# Altium PCB ide_podule-16bit.PcbDoc (part 2 of 2)
Units mm, origin at the board's own origin, x right, y up, seen from the top; angles counter-clockwise.
Board outline 101.85 x 63.25 mm, 2 copper layers (F.Cu, B.Cu); 33 components, 144 nets, 438 pads, 182 vias.
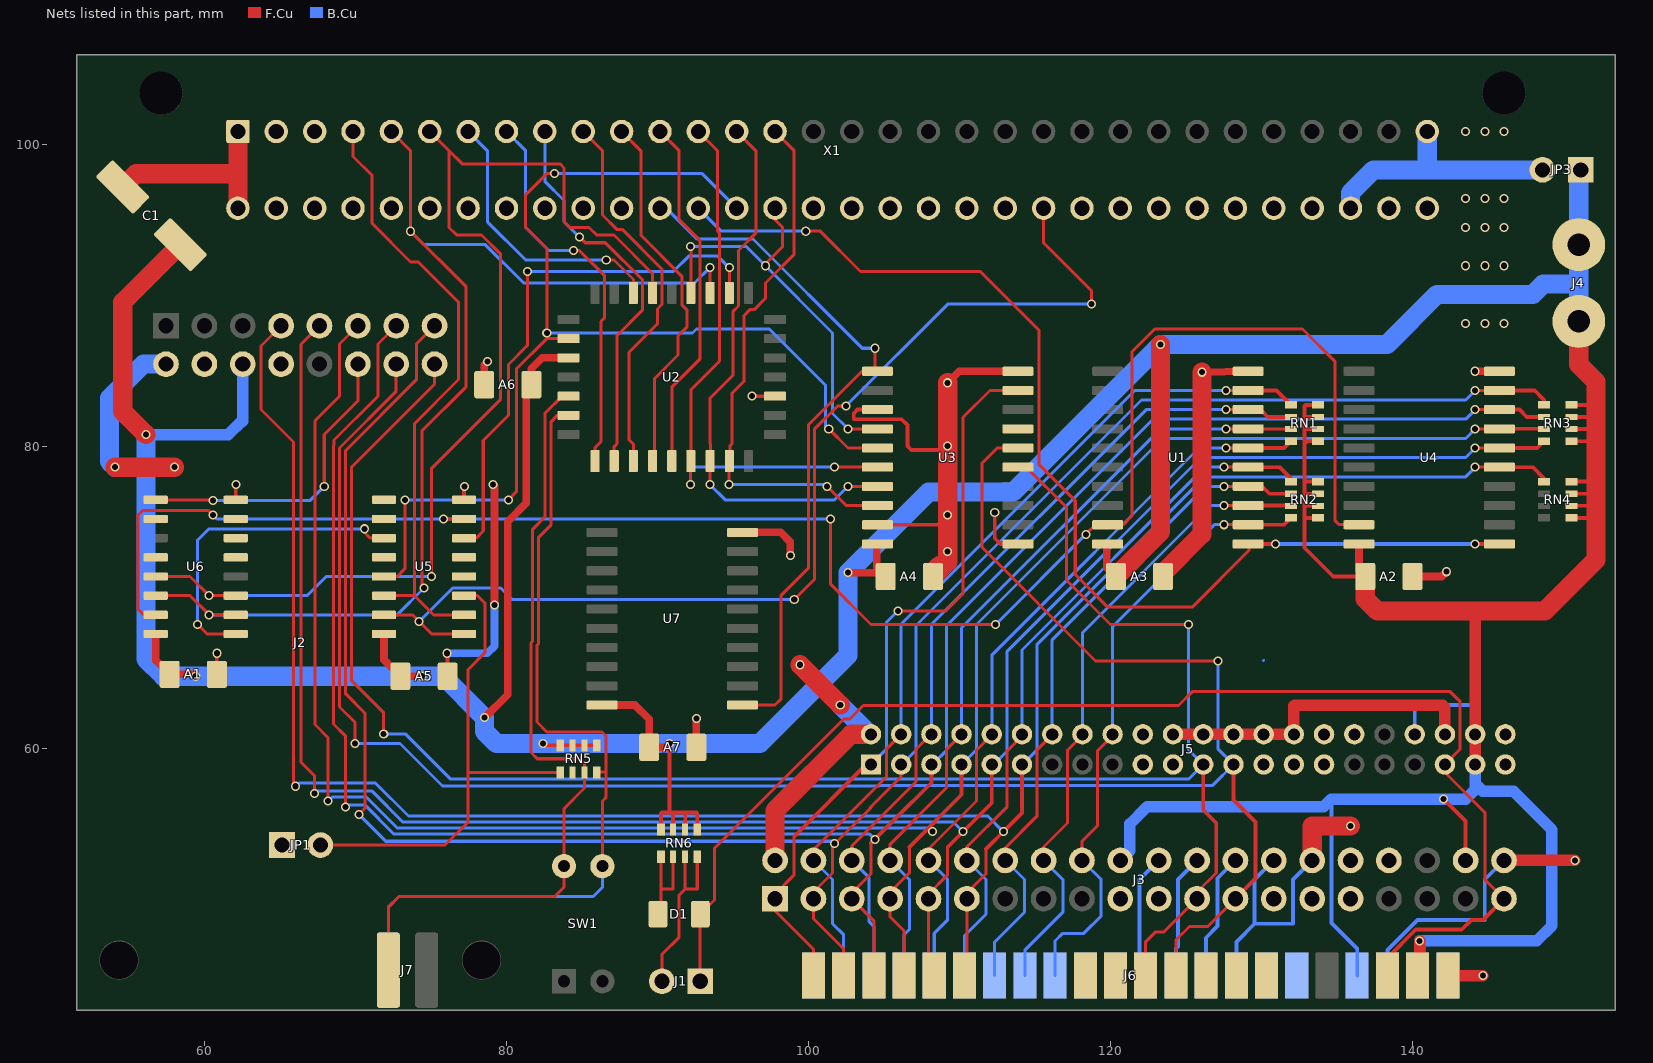
[diagram p2: the nets of this part, all layers, seen from the top]

## Via types
v1: diameter 0.6, hole 0.4, F.Cu to B.Cu, tented both sides, 182 vias

## Nets (pads, with @x,y where several pads share a name; then routed paths per layer and width w, separated by ;. In a path a pad name is that pad's centre, name@x,y a point inside that pad or via, vN(x,y) a via of type N, cw(c..) or ccw(c..) an arc to the next point about the centre after c; other vN are vias at no path point) (continued)
D3: J2.7 J3.11 J5.11 J6.11 RN4.1 U4.5 | length 143.7
  F.Cu w0.2: J2.7@65.089,87.986 63.754,86.651 63.754,82.447 65.913,80.288 65.913,57.632 v1(66.043,57.502) ; J6.11@110.33,44.97 110.49,45.13 J3.11@110.49,50.05 110.49,50.431 111.76,51.701 111.76,53.352 ; v1(144.145,78.625) U4.5@145.797,78.625
  F.Cu w0.254: 111.76,53.352 113.093,54.685 v1(112.903,54.495) 114.14,55.732 J5.11@114.14,58.94 ; U4.5@145.797,78.625 147.955,78.625 148.706,77.874 RN4.1@148.706,77.666
  B.Cu w0.2: v1(66.043,57.502) 66.263,57.721 71.323,57.721 73.52,55.524 111.874,55.524 v1(112.903,54.495) ; J5.11@114.14,58.94 114.173,58.94 115.126,59.892 115.126,66.877 126.238,77.99 143.51,77.99 v1(144.145,78.625)
D4: J2.9 J3.9 J5.9 J6.9 RN3.4 U4.6 | length 141.1
  F.Cu w0.2: v1(67.31,57.02) 67.31,58.178 66.402,59.086 66.402,86.759 J2.9@67.629,87.986 ; J6.9@108.33,44.97 107.95,45.35 J3.9@107.95,50.05 107.95,50.367 109.22,51.637 109.22,53.479 ; v1(144.145,79.895) U4.6@145.797,79.895
  F.Cu w0.254: 109.22,53.479 112.14,56.399 J5.9@112.14,58.94 ; U4.6@145.797,79.895 148.255,79.895 RN3.4@148.706,80.346
  B.Cu w0.2: v1(67.31,57.02) 67.484,57.194 71.088,57.194 73.158,55.124 109.607,55.124 v1(110.236,54.495) ; J5.9@112.14,58.94 112.268,58.94 113.157,59.829 113.157,66.433 125.984,79.26 143.51,79.26 v1(144.145,79.895)
D5: J2.11 J3.7 J5.7 J6.7 RN3.3 U4.7 | length 143
  F.Cu w0.2: v1(68.199,56.512) 68.199,60.718 67.329,61.588 67.329,81.692 68.961,83.324 68.961,86.778 J2.11@70.169,87.986 ; J6.7@106.33,44.97 106.33,47.928 105.41,48.848 J3.7@105.41,50.05 105.41,50.494 106.68,51.764 106.68,53.479 ; v1(144.145,81.165) U4.7@145.797,81.165
  F.Cu w0.254: 106.68,53.479 110.14,56.939 J5.7@110.14,58.94 ; U4.7@145.797,81.165 148.687,81.165 RN3.3@148.706,81.146
  B.Cu w0.2: v1(68.199,56.512) 68.481,56.794 70.726,56.794 72.796,54.724 107.995,54.724 v1(108.204,54.515) ; J5.7@110.14,58.94 111.125,59.925 111.125,68.211 123.444,80.53 143.51,80.53 v1(144.145,81.165)
D6: J2.13 J3.5 J5.5 J6.5 RN3.2 U4.8 | length 142
  F.Cu w0.2: v1(69.342,56.131) 69.342,60.845 68.561,61.626 68.561,80.061 68.595,80.095 68.595,80.418 71.501,83.324 71.501,86.778 J2.13@72.709,87.986 ; 104.14,53.733 104.14,51.701 102.87,50.431 J3.5@102.87,50.05 104.33,48.59 J6.5@104.33,44.97 ; v1(144.145,82.435) U4.8@145.797,82.435
  F.Cu w0.254: 104.14,53.733 105.664,55.257 108.14,57.733 J5.5@108.14,58.94 ; U4.8@145.797,82.435 147.066,82.435 147.555,81.946 RN3.2@148.706,81.946
  B.Cu w0.2: v1(69.342,56.131) 69.478,56.267 70.618,56.267 72.561,54.324 104.057,54.324 v1(104.394,53.987) ; J5.5@108.14,58.94 108.204,58.94 109.156,59.892 109.156,68.147 122.809,81.8 143.51,81.8 v1(144.145,82.435)
D7: J2.15 J3.3 J5.3 J6.3 RN3.1 U4.9 | length 143.3
  F.Cu w0.2: v1(70.231,55.638) 70.627,56.034 70.627,62.354 69.361,63.62 69.361,79.729 74.041,84.409 74.041,86.778 J2.15@75.249,87.986 ; J6.3@102.33,44.97 102.33,46.729 100.33,48.729 J3.3@100.33,50.05 100.33,50.494 101.6,51.764 101.6,53.542 104.14,56.082 104.076,56.082 106.14,58.146 J5.3@106.14,58.94 ; v1(144.145,83.705) U4.9@145.797,83.705
  F.Cu w0.254: U4.9@145.797,83.705 148.082,83.705 148.706,83.081 RN3.1@148.706,82.746
  B.Cu w0.2: v1(70.231,55.638) 72.009,53.86 101.591,53.86 v1(101.727,53.724) ; J5.3@106.14,58.94 106.172,58.94 107.124,59.892 107.124,68.147 122.047,83.07 143.51,83.07 v1(144.145,83.705)
D8: J3.4 J5.4 J6.4 RN1.1 U1.9 | length 59.1
  F.Cu w0.2: J3.4@100.33,52.59 100.33,53.288 105.156,58.114 105.156,59.956 J5.4@106.14,60.94 ; v1(127.635,83.705) U1.9@129.16,83.705
  F.Cu w0.254: U1.9@129.16,83.705 130.983,83.705 RN1.1@131.942,82.746
  B.Cu w0.2: J3.4@100.33,52.59 101.6,51.32 101.6,48.399 102.33,47.669 J6.4@102.33,44.97 ; J5.4@106.14,60.94 106.14,68.243 121.602,83.705 v1(127.635,83.705)
D9: J3.6 J5.6 J6.6 RN1.2 U1.8 | length 55.9
  F.Cu w0.2: J3.6@102.87,52.59 102.87,53.542 107.124,57.797 107.124,59.956 108.109,60.94 J5.6@108.14,60.94 ; v1(127.635,82.435) U1.8@129.16,82.435
  F.Cu w0.254: U1.8@129.16,82.435 129.921,82.435 130.41,81.946 RN1.2@131.942,81.946
  B.Cu w0.2: J3.6@102.87,52.59 104.02,51.44 104.02,48.533 104.33,48.223 J6.6@104.33,44.97 ; J5.6@108.14,60.94 108.14,68.21 122.364,82.435 v1(127.635,82.435)
D10: J3.8 J5.8 J6.8 RN1.3 U1.7 | length 52.9
  F.Cu w0.2: J3.8@105.41,52.59 105.41,53.669 109.156,57.416 109.156,59.956 J5.8@110.14,60.94 ; v1(127.635,81.165) 129.16,81.165 131.923,81.165 RN1.3@131.942,81.146
  B.Cu w0.2: J3.8@105.41,52.59 106.68,51.32 106.68,48.018 106.33,47.668 J6.8@106.33,44.97 ; J5.8@110.14,60.94 110.14,67.988 123.317,81.165 v1(127.635,81.165)
D11: J3.10 J5.10 J6.10 RN1.4 U1.6 | length 49.5
  F.Cu w0.2: J3.10@107.95,52.59 107.95,53.352 111.125,56.527 111.125,59.892 112.14,60.907 J5.10@112.14,60.94 ; v1(127.635,79.895) U1.6@129.16,79.895
  F.Cu w0.254: U1.6@129.16,79.895 131.491,79.895 RN1.4@131.942,80.346
  B.Cu w0.2: J3.10@107.95,52.59 109.22,51.32 109.22,48.653 108.33,47.763 J6.10@108.33,44.97 ; J5.10@112.14,60.94 112.14,66.178 125.857,79.895 v1(127.635,79.895)
D12: J3.12 J5.12 J6.12 RN2.1 U1.5 | length 47.5
  F.Cu w0.2: J3.12@110.49,52.59 110.49,53.479 113.157,56.146 113.157,59.829 114.14,60.812 J5.12@114.14,60.94 ; v1(127.508,78.625) U1.5@129.16,78.625
  F.Cu w0.254: U1.5@129.16,78.625 131.191,78.625 131.942,77.874 RN2.1@131.942,77.666
  B.Cu w0.2: J6.12@110.33,44.97 110.33,47.604 111.76,49.034 111.76,51.32 J3.12@110.49,52.59 ; J5.12@114.14,60.94 114.14,66.527 126.238,78.625 v1(127.508,78.625)
D13: J3.14 J5.14 J6.14 RN2.2 U1.4 | length 45.1
  F.Cu w0.2: J3.14@113.03,52.59 113.03,53.415 115.126,55.511 115.126,59.892 116.14,60.907 J5.14@116.14,60.94 ; v1(127.508,77.355) U1.4@129.16,77.355
  F.Cu w0.254: U1.4@129.16,77.355 130.048,77.355 130.537,76.866 RN2.2@131.942,76.866
  B.Cu w0.2: J6.14@112.33,44.97 112.33,47.191 114.3,49.161 114.3,51.32 J3.14@113.03,52.59 ; J5.14@116.14,60.94 116.14,67.193 126.301,77.355 v1(127.508,77.355)
D14: J3.16 J5.16 J6.16 RN2.3 U1.3 | length 42.6
  F.Cu w0.2: J3.16@115.57,52.59 115.57,53.479 117.157,55.066 117.157,59.892 118.14,60.875 J5.16@118.14,60.94 ; v1(127.508,76.085) U1.3@129.16,76.085
  F.Cu w0.254: U1.3@129.16,76.085 131.923,76.085 RN2.3@131.942,76.066
  B.Cu w0.2: J6.16@114.33,44.97 114.33,46.651 116.84,49.161 116.84,51.32 J3.16@115.57,52.59 ; J5.16@118.14,60.94 118.14,67.669 126.555,76.085 v1(127.508,76.085)
D15: J3.18 J5.18 J6.18 RN2.4 U1.2 | length 41.3
  F.Cu w0.2: J3.18@118.11,52.59 118.11,53.86 119.126,54.876 119.126,59.829 120.14,60.843 J5.18@120.14,60.94 ; v1(127.508,74.815) U1.2@129.16,74.815
  F.Cu w0.254: U1.2@129.16,74.815 131.491,74.815 RN2.4@131.942,75.266
  B.Cu w0.2: J6.18@116.33,44.97 116.33,47.254 116.84,47.764 118.237,47.764 119.38,48.907 119.38,51.32 J3.18@118.11,52.59 ; J5.18@120.14,60.94 120.14,68.082 126.873,74.815 v1(127.508,74.815)
F_CE: U2.22 U5.6 | length 35.6
  F.Cu w0.2: U5.6@77.199,73.926 77.999,73.926 78.471,74.398 78.471,80.388 80.137,82.054 80.137,85.419 81.407,86.689 v1(81.407,91.579) ; U2.22@94.763,90.156 v1(94.763,91.833)
  B.Cu w0.2: v1(81.407,91.579) 91.059,91.579 92.075,92.595 94.001,92.595 v1(94.763,91.833)
F_Enable: JP1.2 RN5.5 U5.3 | length 33.1
  F.Cu w0.2: JP1.2@67.686,53.606 75.946,53.606 77.47,55.13 77.47,58.432 ; U5.3@77.199,70.116 78.09,70.116 78.576,69.63 78.576,66.333 77.47,65.226 77.47,58.432 ; RN5.5@83.579,58.41 77.492,58.41 77.47,58.432
GND: A1.2 A2.2 A3.2 A4.2 A5.2 A6.2 A7.2 C1.2 J2.2 J2.4 J3.2 J3.22 J3.24 J3.26 J3.28 J3.30 J3.40 J5.2 J5.22 J5.24 J5.26 J5.28 J5.30 J5.40 J5.43 J6.2 J6.22 J6.24 J6.26 J6.28 J6.30 J6.40 J6.43 JP1.1 U1.10 U2.16 U3.1 U3.10 U3.13 U3.19 U4.10 U5.8 U6.8 U7.10 X1.a1 X1.c1 | length 219.6
  F.Cu w0.2: J5.28@130.14,60.94 J5.28@130.207,60.94 ; J3.28@130.81,52.59 J3.28@131.127,52.907
  F.Cu w0.254: A1.2@60.833,64.909 v1(60.833,66.306) ; U6.8@62.086,76.466 62.086,77.465 v1(62.103,77.482) ; v1(76.073,66.306) 76.111,66.268 A5.2@76.111,64.782 ; U5.8@77.199,76.466 77.199,77.338 v1(77.216,77.355) ; v1(96.266,83.324) U2.16@97.79,83.324 ; U3.19@104.57,74.815 108.581,74.815 v1(109.22,75.454) ; U3.13@104.57,82.435 103.251,82.435 102.997,82.181 102.997,81.8 106.172,81.8 106.553,81.419 106.553,80.022 106.807,79.768 108.966,79.768 v1(109.22,80.022) ; v1(112.336,75.625) 112.336,73.921 112.712,73.545 U3.1@113.92,73.545
  F.Cu w0.508: A6.2@78.536,84.086 78.536,85.406 v1(78.74,85.61) ; v1(79.121,77.482) 79.214,77.389 v1(79.214,69.499) ; A7.2@92.583,60.083 v1(92.583,61.988) ; U7.10@95.631,74.307 98.171,74.307 98.806,73.672 v1(98.806,72.783) ; v1(109.22,84.213) 109.982,84.975 U3.10@113.92,84.975 ; v1(126.047,84.911) U1.10@129.16,84.975 ; A2.2@139.992,71.386 141.922,71.386 v1(142.24,71.703) ; v1(144.145,84.975) U4.10@145.797,84.975
  F.Cu w0.762: J5.22@124.14,60.94 J5.24@126.14,60.94 J5.26@128.14,60.94 J5.28@130.14,60.94 J5.30@132.14,60.94 132.14,62.817 132.2,62.877 141.986,62.877 142.14,62.723 J5.40@142.14,60.94 ; J6.43@142.33,44.97 v1(144.653,44.97) ; J3.40@146.05,52.59 v1(150.749,52.59)
  F.Cu w1.27: v1(54.102,78.625) v1(58.039,78.625) ; C1.2@54.602,97.175 55.482,98.056 62.23,98.056 ; X1.c1@62.23,95.77 62.23,98.056 ; X1.a1@62.23,100.85 62.23,98.056 ; J3.2@97.79,52.59 97.79,55.892 102.838,60.94 J5.2@104.14,60.94 ; v1(99.441,65.544) v1(102.108,62.877) ; A4.2@108.68,72.116 108.242,71.678 A4.2@108.242,71.386 109.22,72.364 v1(109.22,73.037) v1(109.22,75.454) v1(109.22,80.022) v1(109.22,84.213) ; A3.2@123.482,71.386 123.482,71.615 126.047,74.18 v1(126.047,84.911) ; J3.30@133.35,52.59 133.35,54.876 v1(135.89,54.876)
  B.Cu w0.2: 130.124,65.834 130.14,65.818
  B.Cu w0.254: J6.24@122.33,44.97 122.33,45.134 121.92,45.544 121.92,51.32 J3.22@123.19,52.59 ; J6.26@124.33,44.97 124.33,46.748 124.46,46.878 124.46,51.32 J3.24@125.73,52.59 ; J6.28@126.33,46.113 126.33,47.475 127.093,48.238 127.093,51.413 J3.26@128.27,52.59 ; J6.30@128.33,44.97 128.33,47.189 129.54,48.399 ; J3.28@130.81,52.59 129.54,51.32 129.54,48.399 ; J3.30@133.35,52.59 132.08,51.32 132.08,48.399 129.54,48.399 ; J6.40@138.33,44.97 138.33,46.648 140.335,48.653 144.78,48.653 144.78,51.32 J3.40@146.05,52.59
  B.Cu w0.508: v1(76.073,66.306) 78.74,66.306 79.214,66.78 v1(79.214,69.499)
  B.Cu w1.27: v1(54.102,78.625) 53.721,79.006 53.721,83.197 55.97,85.446 J2.2@57.469,85.446 ; v1(102.108,62.877) 104.045,60.94 J5.2@104.14,60.94
  other v1: 143.51,88.15 144.78,88.15 146.05,88.15 143.51,91.96 144.78,91.96 146.05,91.96 143.51,94.5 144.78,94.5 146.05,94.5 143.51,96.405 144.78,96.405 146.05,96.405 143.51,100.85 144.78,100.85 146.05,100.85
LA2: U2.12 U3.18 X1.a15 | length 36.3
  F.Cu w0.2: v1(94.742,77.482) 94.742,79.011 U2.12@94.763,79.031 94.793,79.062 94.793,80.022 94.945,80.174 94.945,83.527 95.743,84.325 95.743,88.673 96.124,89.054 96.408,89.054 97.155,89.801 97.155,90.817 99.06,92.722 99.06,99.58 X1.a15@97.79,100.85 ; v1(101.234,77.355) 102.504,76.085 U3.18@104.57,76.085
  B.Cu w0.2: v1(94.742,77.482) 101.107,77.482 v1(101.234,77.355)
LA3: U2.11 U3.17 X1.a14 | length 37.1
  F.Cu w0.2: v1(93.472,77.482) 93.472,79.011 U2.11@93.493,79.031 93.523,79.062 93.523,80.174 93.472,80.225 93.472,83.167 94.996,84.691 94.996,88.912 95.377,89.293 95.377,92.976 96.52,94.119 96.52,99.58 X1.a14@95.25,100.85 ; v1(102.616,77.355) U3.17@104.57,77.355
  B.Cu w0.2: v1(93.472,77.482) 94.488,76.466 101.727,76.466 v1(102.616,77.355)
LA4: U2.10 U3.16 X1.a13 | length 38.1
  F.Cu w0.2: v1(92.202,77.482) 92.202,79.011 U2.10@92.223,79.031 92.223,83.756 94.107,85.64 94.107,94.119 93.98,94.246 93.98,99.58 X1.a13@92.71,100.85 ; v1(101.727,78.625) U3.16@104.57,78.625
  B.Cu w0.2: v1(92.202,77.482) 92.202,78.371 92.456,78.625 v1(101.727,78.625)
LA5: U2.9 X1.a12 | length 23.7
  F.Cu w0.2: X1.a12@90.17,100.85 91.44,99.58 91.44,95.008 92.837,93.611 92.837,85.806 90.953,83.922 U2.9@90.953,79.031
LA6: U2.8 X1.a11 | length 24.5
  F.Cu w0.2: X1.a11@87.63,100.85 88.9,99.58 88.9,93.992 91.622,91.269 91.622,89.378 91.948,89.053 91.948,87.896 91.37,87.318 91.37,86.048 89.823,84.501 89.823,79.172 U2.8@89.683,79.031
LA7: U2.7 X1.a10 | length 25.2
  F.Cu w0.2: X1.a10@85.09,100.85 86.36,99.58 86.36,95.32 87.307,94.373 87.669,94.373 90.297,91.745 90.297,89.393 90.005,89.101 90.005,88.112 88.123,86.23 88.123,80.438 88.413,80.149 U2.7@88.413,79.031
LA8: U2.6 X1.a9 | length 26.1
  F.Cu w0.2: v1(84.836,93.865) 85.217,93.484 86.556,93.484 89.027,91.013 89.027,89.039 87.323,87.335 87.323,81.665 87.319,81.66 87.319,80.161 87.143,79.985 U2.6@87.143,79.031
  B.Cu w0.2: X1.a9@82.55,100.85 82.55,97.548 83.82,96.278 83.82,94.881 v1(84.836,93.865)
LA9: U2.5 X1.a8 | length 25.9
  F.Cu w0.2: v1(84.455,92.976) 84.836,92.976 86.487,91.325 86.487,88.493 86.271,88.277 86.271,80.314 85.873,79.915 U2.5@85.873,79.031
  B.Cu w0.2: X1.a8@80.01,100.85 81.28,99.58 81.28,94.5 82.804,92.976 v1(84.455,92.976)
LA10: U2.27 X1.a7 | length 18.6
  F.Cu w0.2: v1(86.614,92.341) 87.122,92.341 88.413,91.05 U2.27@88.413,90.156
  B.Cu w0.2: X1.a7@77.47,100.85 78.74,99.58 78.74,94.881 81.28,92.341 v1(86.614,92.341)
LA11: U2.26 U6.3 U6.13 X1.a6 | length 75.6
  F.Cu w0.2: U6.13@56.786,71.386 59.055,71.386 v1(60.325,70.116) U6.3@62.086,70.116 ; X1.a6@74.93,100.85 76.2,99.58 ; v1(75.057,71.386) 75.057,78.556 79.629,83.128 79.629,92.722 78.359,93.992 76.708,93.992 76.2,94.5 76.2,99.58 ; U2.26@89.683,90.156 89.683,91.431 87.122,93.992 85.979,93.992 85.471,94.5 84.201,94.5 83.82,94.881 83.82,98.437 83.551,98.706 77.074,98.706 76.2,99.58
  B.Cu w0.2: v1(60.325,70.116) 66.802,70.116 68.072,71.386 v1(75.057,71.386)
LA12: U2.23 U6.2 U6.14 X1.a5 | length 77.7
  F.Cu w0.2: U6.14@56.786,70.116 59.055,70.116 v1(60.325,68.846) U6.2@62.086,68.846 ; X1.a5@72.39,100.85 73.66,99.58 v1(73.66,94.246) 77.343,90.563 77.343,83.959 74.407,81.023 74.407,70.766 v1(74.549,70.624) ; v1(93.472,91.833) 93.493,91.812 U2.23@93.493,90.156
  B.Cu w0.2: v1(60.325,68.846) 72.771,68.846 v1(74.549,70.624) ; v1(73.66,94.246) 74.549,93.357 78.613,93.357 81.153,90.817 92.456,90.817 v1(93.472,91.833)
LA13: U5.2 U5.14 X1.a4 | length 41
  F.Cu w0.2: X1.a4@69.85,100.85 69.85,99.199 71.12,97.929 71.12,94.754 73.66,92.214 74.168,92.214 76.835,89.547 76.835,84.429 73.914,81.508 73.914,70.116 ; U5.14@71.899,70.116 73.533,70.116 73.914,70.116 ; U5.2@77.199,68.846 75.184,68.846 73.914,70.116
LA14: X1.a3
LA15: X1.a2
Net-(D1-A): D1.2 RN6.5 RN6.6 | length 6.8
  F.Cu w0.2: D1.2@90.043,49.034 90.24,49.231 90.24,50.685 ; RN6.5@90.24,52.833 90.24,50.685 ; RN6.6@91.04,52.833 91.04,50.704 91.021,50.685 90.24,50.685
Net-(D1-K): D1.1 J1.1 J3.39 J5.39 J6.39 | length 88.7
  F.Cu w0.2: J1.1@92.837,44.589 92.837,49.028 D1.1@92.843,49.034 93.777,49.968 93.777,53.403 102.316,61.942 102.722,61.942 103.632,62.852 124.498,62.852 125.412,63.766 142.494,63.766 143.129,63.131 143.129,59.929 J5.39@142.14,58.94 142.14,58.405 144.78,55.765 144.78,51.32 J3.39@146.05,50.05
  F.Cu w0.254: J6.39@138.33,44.97 138.33,46.14 140.208,48.018 143.256,48.018 143.891,48.653 144.653,48.653 J3.39@146.05,50.05
Net-(J1-P2): J1.2 RN6.7 RN6.8 | length 11.9
  F.Cu w0.2: J1.2@90.297,44.589 90.297,46.367 91.44,47.51 91.44,50.304 91.84,50.704 ; RN6.7@91.84,52.833 91.84,50.704 ; RN6.8@92.64,52.833 92.64,50.685 91.821,50.685 91.84,50.704
Net-(J7-Pin_1): J7.1 RN5.7 SW1.4 U2.2 | length 53.9
  F.Cu w0.2: J7.1@72.187,45.224 72.187,49.491 72.898,50.202 83.21,50.202 83.82,50.812 SW1.4@83.82,52.209 83.82,56.019 85.179,57.378 RN5.7@85.179,58.41 85.179,59.01 84.868,59.321 82.042,59.321 81.627,59.736 81.627,66.995 81.743,67.11 81.743,74.516 82.565,75.338 82.565,82.196 83.693,83.324 U2.2@84.115,83.324
Net-(J7-Pin_3): J7.3 RN5.8 SW1.3 U2.3 | length 56.3
  F.Cu w0.2: U2.3@84.115,82.054 83.378,82.054 82.965,81.641 82.965,74.815 82.143,73.993 82.143,66.945 82.027,66.829 82.027,61.749 82.677,61.099 86.34,61.099 86.614,60.825 86.614,58.432 ; RN5.8@85.979,58.41 86.001,58.432 86.614,58.432 ; SW1.3@86.36,52.209 86.36,56.527 86.614,56.781 86.614,58.432
  B.Cu w0.2: J7.3@72.187,45.224 72.187,49.491 72.898,50.202 85.75,50.202 86.36,50.812 SW1.3@86.36,52.209
Net-(U5B-O1): U5.11 U6.1 | length 21.4
  F.Cu w0.2: v1(59.563,68.211) 60.198,67.576 U6.1@62.086,67.576 ; v1(70.612,74.547) 70.612,74.307 70.993,73.926 U5.11@71.899,73.926
  B.Cu w0.2: v1(59.563,68.211) 59.563,73.799 60.311,74.547 v1(70.612,74.547)
Net-(X1-Pin_a32): JP3.2 X1.a32 X1.c30 | length 16.9
  B.Cu w1.27: X1.c30@135.89,95.77 135.89,96.786 137.414,98.31 140.97,98.31 ; X1.a32@140.97,100.85 140.97,98.31 ; JP3.2@148.59,98.31 140.97,98.31
PR{slash}{\W\}\: U1.1 U4.1 X1.c13 | length 74.1
  F.Cu w0.2: v1(99.822,94.246) 100.786,94.246 103.453,91.579 111.379,91.579 115.252,87.705 115.252,80.212 115.255,80.21 115.255,78.813 117.665,76.402 117.665,71.513 119.825,69.354 125.412,69.354 129.16,73.101 U1.1@129.16,73.545
  F.Cu w0.254: U1.1@129.16,73.545 v1(130.937,73.545) ; v1(144.145,73.545) U4.1@145.797,73.545
  B.Cu w0.2: X1.c13@92.71,95.77 94.234,94.246 v1(99.822,94.246)
  B.Cu w0.254: v1(130.937,73.545) v1(144.145,73.545)
U2K: U1.19 U4.19 U5.7 U6.15 | length 122.9
  F.Cu w0.2: U6.15@56.786,68.846 55.986,68.846 55.626,69.206 55.626,75.459 55.938,75.771 60.258,75.771 v1(60.579,75.45) ; v1(75.834,75.196) U5.7@77.199,75.196 ; v1(101.473,75.196) 101.473,70.878 104.14,68.211 v1(112.395,68.211) ; v1(118.364,74.18) 118.999,74.815 U1.19@119.81,74.815 U1.19@119.126,74.815 ; U1.19@119.76,74.815 120.84,74.815 121.412,75.386 121.412,86.245 122.936,87.769 132.715,87.769 134.874,85.61 134.874,75.069 135.128,74.815 U4.19@136.397,74.815
  F.Cu w0.254: U1.19@119.126,74.815 U1.19@119.76,74.815
  B.Cu w0.2: v1(60.579,75.45) 60.833,75.196 v1(75.834,75.196) v1(101.473,75.196) ; v1(112.395,68.211) v1(118.364,74.18)
unconnected-(J2-Pin_8-Pad8): J2.8
unconnected-(J3-P19-Pad19): J3.19
unconnected-(J3-P21-Pad21): J3.21
unconnected-(J3-P27-Pad27): J3.27
unconnected-(J3-P29-Pad29): J3.29
unconnected-(J3-P31-Pad31): J3.31
unconnected-(J3-P32-Pad32): J3.32
unconnected-(J3-P34-Pad34): J3.34
unconnected-(J5-P19-Pad19): J5.19
unconnected-(J5-P20-Pad20): J5.20
unconnected-(J5-P21-Pad21): J5.21
unconnected-(J5-P27-Pad27): J5.27
unconnected-(J5-P29-Pad29): J5.29
unconnected-(J5-P31-Pad31): J5.31
unconnected-(J5-P32-Pad32): J5.32
unconnected-(J5-P34-Pad34): J5.34
unconnected-(J5-P44-Pad44): J5.44
unconnected-(J6-P19-Pad19): J6.19
unconnected-(J6-P20-Pad20): J6.20
unconnected-(J6-P21-Pad21): J6.21
unconnected-(J6-P27-Pad27): J6.27
unconnected-(J6-P29-Pad29): J6.29
unconnected-(J6-P31-Pad31): J6.31
unconnected-(J6-P32-Pad32): J6.32
unconnected-(J6-P34-Pad34): J6.34
unconnected-(J6-P44-Pad44): J6.44
unconnected-(RN5-R3.2-Pad6): RN5.6
unconnected-(U3-A5-Pad7): U3.7
unconnected-(U5A-O0-Pad4): U5.4
unconnected-(U5A-O1-Pad5): U5.5
unconnected-(U5B-O0-Pad12): U5.12
unconnected-(U5B-O2-Pad10): U5.10
unconnected-(U5B-O3-Pad9): U5.9
unconnected-(U6A-O1-Pad5): U6.5
unconnected-(U6A-O2-Pad6): U6.6
unconnected-(U6A-O3-Pad7): U6.7
unconnected-(U6B-O0-Pad12): U6.12
unconnected-(U6B-O2-Pad10): U6.10
unconnected-(X1-Pin_c2-Padc2): X1.c2
unconnected-(X1-Pin_c3-Padc3): X1.c3
unconnected-(X1-Pin_c4-Padc4): X1.c4
unconnected-(X1-Pin_c5-Padc5): X1.c5
unconnected-(X1-Pin_c6-Padc6): X1.c6
unconnected-(X1-Pin_c7-Padc7): X1.c7
unconnected-(X1-Pin_c8-Padc8): X1.c8
unconnected-(X1-Pin_c9-Padc9): X1.c9
unconnected-(X1-Pin_c10-Padc10): X1.c10
unconnected-(X1-Pin_c11-Padc11): X1.c11
unconnected-(X1-Pin_c16-Padc16): X1.c16
unconnected-(X1-Pin_c17-Padc17): X1.c17
unconnected-(X1-Pin_c18-Padc18): X1.c18
unconnected-(X1-Pin_c19-Padc19): X1.c19
unconnected-(X1-Pin_c20-Padc20): X1.c20
unconnected-(X1-Pin_c21-Padc21): X1.c21
unconnected-(X1-Pin_c23-Padc23): X1.c23
unconnected-(X1-Pin_c24-Padc24): X1.c24
unconnected-(X1-Pin_c25-Padc25): X1.c25
unconnected-(X1-Pin_c26-Padc26): X1.c26
unconnected-(X1-Pin_c27-Padc27): X1.c27
unconnected-(X1-Pin_c28-Padc28): X1.c28
unconnected-(X1-Pin_c29-Padc29): X1.c29
unconnected-(X1-Pin_c31-Padc31): X1.c31
unconnected-(X1-Pin_c32-Padc32): X1.c32
VCC: A1.1 A2.1 A3.1 A4.1 A5.1 A6.1 A7.1 C1.1 J2.6 J3.20 J3.38 J4.1 J5.38 J5.41 J5.42 J6.38 J6.41 J6.42 JP3.1 RN1.5 RN1.6 RN1.7 RN1.8 RN2.5 RN2.6 RN2.7 RN2.8 RN3.5 RN3.6 RN3.7 RN3.8 RN4.5 RN4.6 RN4.7 RN4.8 RN5.1 RN5.2 RN5.3 RN5.4 RN6.1 RN6.2 RN6.3 RN6.4 U1.20 U2.32 U3.20 U4.20 U5.16 U6.16 U7.20 | length 417.5
  F.Cu w0.254: v1(82.423,60.337) 82.55,60.21 RN5.4@83.579,60.21 RN5.3@84.379,60.21 RN5.2@85.179,60.21 RN5.1@85.979,60.21 ; RN6.4@90.24,54.633 90.24,55.708 90.297,55.765 90.805,55.765 ; v1(90.805,60.337) 90.805,55.765 ; RN6.3@91.04,54.633 91.04,55.746 91.059,55.765 ; RN6.2@91.84,54.633 91.84,55.746 91.821,55.765 ; RN6.1@92.64,54.633 92.64,55.708 92.583,55.765 91.821,55.765 ; A4.1@104.68,71.64 104.934,71.386 A4.1@105.118,71.386 ; 132.842,75.266 RN2.5@133.742,75.266 ; 132.842,76.066 RN2.6@133.742,76.066 ; 132.842,76.866 RN2.7@133.742,76.866 ; 132.842,77.666 RN2.8@133.742,77.666 ; 132.842,80.276 132.969,80.276 ; 132.842,81.946 RN1.7@133.742,81.946 ; 132.912,80.276 132.842,80.346 RN1.5@133.742,80.346 ; RN1.6@133.742,81.146 132.842,81.146 ; RN1.8@133.742,82.746 132.899,82.746 132.842,82.689 132.842,81.927 132.842,81.146 ; A2.1@136.868,71.386 134.747,71.386 132.842,73.291 132.842,81.146 ; v1(142.049,56.654) 143.51,55.193 J3.38@143.51,52.59 ; RN4.5@150.506,75.266 152.146,75.266 152.089,75.323 151.892,75.323 152.146,75.323 ; RN4.6@150.506,76.066 152.146,76.066 152.038,75.958 152.019,75.958 152.146,75.958 ; RN4.7@150.506,76.866 152.146,76.866 152,76.72 151.892,76.72 152.146,76.72 ; RN4.8@150.506,77.666 152.146,77.666 152.089,77.609 151.892,77.609 152.146,77.609 ; RN3.5@150.506,80.346 152.146,80.346 152.146,80.403 ; RN3.6@150.506,81.146 152.146,81.146 152.127,81.165 152.019,81.165 152.146,81.165 ; RN3.7@150.506,81.946 152.146,81.946 152.038,82.054 152.019,82.054 152.146,82.054 ; RN3.8@150.506,82.746 152.146,82.746 152.089,82.689 151.892,82.689 152.146,82.689 ; 90.805,55.765 91.059,55.765 ; 91.059,55.765 91.821,55.765
  F.Cu w0.508: U6.16@56.786,67.576 56.786,65.831 A1.1@57.708,64.909 59.309,64.909 v1(59.436,64.782) ; U5.16@71.899,67.576 71.899,65.869 A5.1@72.987,64.782 v1(74.422,64.782) ; v1(78.556,62.045) 80.083,63.572 80.083,75.015 81.322,76.254 81.322,83.747 A6.1@81.661,84.086 81.661,85.15 82.375,85.864 U2.32@84.115,85.864 ; U7.20@86.331,62.877 88.519,62.877 89.458,61.938 A7.1@89.458,60.083 90.551,60.083 v1(90.805,60.337) ; v1(102.616,71.64) 104.864,71.64 A4.1@105.118,71.386 104.52,71.984 U3.20@104.52,73.545 ; U1.20@119.76,73.545 119.76,71.984 A3.1@120.358,71.386 ; U4.20@136.447,73.545 136.447,71.806 A2.1@136.868,71.386
  F.Cu w0.762: J6.41@140.33,44.97 140.462,45.102 v1(140.462,47.256) ; J5.41@144.14,58.94 J5.42@144.14,60.94 ; J5.42@144.145,60.972 144.14,60.977 144.14,68.978 144.145,68.973 148.625,68.973 149.514,69.862
  F.Cu w1.27: v1(56.134,80.784) 54.61,82.308 54.61,89.547 C1.1@58.42,93.357 ; A3.1@120.358,71.386 123.317,74.345 v1(123.317,86.753) ; A2.1@136.868,71.386 136.868,69.9 137.668,69.1 148.752,69.1 149.514,69.862 150.114,70.462 152.146,72.494 152.146,75.323 152.146,75.958 152.146,76.72 152.146,77.609 152.146,80.403 152.146,81.165 152.146,82.054 152.146,82.689 ; J4.1@151.003,88.277 151.003,85.419 152.146,84.276 152.146,82.746
  B.Cu w0.254: 134.62,56.654 134.62,48.458 136.33,46.748 J6.38@136.33,44.97 ; J5.38@140.14,60.94 140.14,62.555 140.462,62.877 143.891,62.877 144.14,62.628 J5.42@144.14,60.94
  B.Cu w0.762: v1(56.134,80.784) 61.595,80.784 62.486,81.675 62.549,81.675 J2.6@62.549,85.446 ; J3.20@120.65,52.59 121.285,53.225 121.285,55.003 122.44,56.158 134.124,56.158 134.62,56.654 v1(142.049,56.654) 143.51,56.654 144.14,57.284 J5.41@144.14,58.94 ; J6.42@140.33,44.97 140.462,45.102 v1(140.462,47.256) 148.209,47.256 149.225,48.272 149.225,54.622 146.685,57.162 144.648,57.162 144.14,57.67 J5.41@144.14,58.31
  B.Cu w1.27: v1(56.134,80.784) 56.134,79.133 56.134,65.925 57.277,64.782 v1(59.436,64.782) v1(74.422,64.782) 75.819,64.782 v1(78.556,62.045) 78.556,61.131 79.35,60.337 v1(82.423,60.337) 85.725,60.337 v1(90.805,60.337) 96.774,60.337 102.616,66.179 v1(102.616,71.64) 107.95,76.974 113.538,76.974 v1(123.317,86.753) 138.303,86.753 141.605,90.055 147.955,90.055 148.653,90.753 151.003,90.753 ; J4.1@151.003,88.277 151.003,90.753 ; JP3.1@151.13,98.31 151.003,98.183 J4.1@151.003,93.357 151.003,90.753
{\B\I\O\R\D\}\: J2.14 J3.25 J5.25 J6.25 U3.6 | length 138.9
  F.Cu w0.2: v1(69.977,60.337) 69.977,61.734 68.961,62.75 68.961,79.895 72.709,83.643 J2.14@72.709,85.446 ; U3.6@113.87,79.895 112.492,79.895 111.491,78.894 111.491,73.316 119.009,65.798 v1(127.127,65.798) ; J6.25@124.33,44.97 124.33,47.329 125.222,48.221 126.441,48.221 J3.25@128.27,50.05
  F.Cu w0.254: J5.25@128.14,58.94 128.14,56.593 129.603,55.13 129.603,51.383 J3.25@128.27,50.05
  B.Cu w0.2: v1(69.977,60.337) 71.374,60.337 72.958,60.337 75.771,57.524 104.687,57.524 104.728,57.565 126.765,57.565 J5.25@128.14,58.94 127.127,59.953 v1(127.127,65.798)
{\B\I\O\W\R\}\: J2.16 J3.23 J5.23 J6.23 U3.5 | length 128.2
  F.Cu w0.2: v1(71.882,60.972) 71.882,62.369 69.761,64.49 69.761,78.633 75.249,84.121 J2.16@75.249,85.446 ; U3.5@113.92,78.625 114.427,78.625 117.079,75.973 117.079,71.137 120.005,68.211 v1(125.158,68.211) ; J6.23@122.33,44.97 122.33,47.209 122.987,47.866 123.546,47.866 J3.23@125.73,50.05 125.73,50.494 127,51.764 127,55.066
  F.Cu w0.254: J5.23@126.14,58.94 126.14,55.926 127,55.066
  B.Cu w0.2: v1(71.882,60.972) 73.304,60.972 76.311,57.965 125.165,57.965 J5.23@126.14,58.94 125.158,59.921 v1(125.158,68.211)
{\I\O\R\D\}\: U2.24 U3.14 X1.c15 | length 28.1
  F.Cu w0.2: v1(92.202,93.23) 92.223,93.209 U2.24@92.223,90.156 ; v1(97.155,91.96) 97.155,92.087 98.298,93.23 98.298,94.5 97.79,95.008 X1.c15@97.79,95.77 ; v1(102.616,81.165) U3.14@104.57,81.165
  B.Cu w0.2: v1(92.202,93.23) 95.885,93.23 v1(97.155,91.96) 101.6,87.515 101.6,82.181 v1(102.616,81.165)
{\I\O\W\R\}\: U2.31 U3.15 U5.13 X1.c14 | length 79.3
  F.Cu w0.2: U5.13@71.899,71.386 72.771,71.386 73.279,71.894 v1(73.279,76.466) ; v1(80.137,76.466) 80.664,76.993 80.664,85.121 82.677,87.134 ; v1(83.2,98.056) 82.677,98.056 81.28,96.659 81.28,94.5 82.677,93.103 v1(82.677,87.515) 82.677,87.134 ; U2.31@84.768,87.134 U2.31@84.115,87.134 82.677,87.134 ; v1(101.346,81.165) 102.616,79.895 U3.15@104.57,79.895
  B.Cu w0.2: v1(73.279,76.466) v1(80.137,76.466) ; v1(82.677,87.515) 92.329,87.515 92.583,87.769 97.409,87.769 101.144,84.034 101.144,81.367 v1(101.346,81.165) ; v1(83.2,98.056) 92.964,98.056 X1.c14@95.25,95.77
{\P\S\}\: U5.1 U5.15 X1.c22 | length 73.2
  F.Cu w0.2: U5.15@71.899,68.846 73.787,68.846 v1(74.231,68.401) 75.057,67.576 U5.1@77.199,67.576 ; v1(99.06,69.862) 100.392,71.194 100.392,81.13 101.951,82.689 v1(102.489,82.689) ; X1.c22@115.57,95.77 115.57,93.484 118.745,90.309 v1(118.745,89.42)
  B.Cu w0.2: v1(74.231,68.401) 76.454,70.624 79.629,70.624 80.391,69.862 v1(99.06,69.862) ; v1(102.489,82.689) 109.22,89.42 v1(118.745,89.42)
{\R\S\T\-\B\}\: J3.1 J5.1 J6.1 U3.9 | length 48.5
  F.Cu w0.2: J3.1@97.79,49.254 100.33,46.714 J6.1@100.33,44.97 ; J3.1@97.79,50.367 99.06,51.637 99.06,54.177 ; v1(105.918,69.1) 109.093,69.1 110.236,70.243 110.236,81.927 112.014,83.705 U3.9@113.92,83.705
  F.Cu w0.254: 99.06,54.177 103.822,58.94 J5.1@104.14,58.94
  B.Cu w0.2: J5.1@104.14,58.94 105.156,59.956 105.156,68.338 v1(105.918,69.1)
{\R\S\T\}\: U3.11 U7.1 X1.c12 | length 47.3
  F.Cu w0.2: U7.1@95.631,62.877 97.79,62.877 98.171,63.258 98.171,70.116 99.992,71.937 99.992,81.422 103.545,84.975 U3.11@104.57,84.975 104.394,85.151 v1(104.394,86.499)
  B.Cu w0.2: X1.c12@90.17,95.77 90.581,95.77 92.613,93.738 96.324,93.738 103.563,86.499 v1(104.394,86.499)
{\U\S\B\_\C\S\}\: J2.12 U6.9 | length 20.6
  F.Cu w0.2: U6.9@56.786,76.466 60.545,76.466 v1(60.579,76.432) ; v1(67.945,77.355) 67.945,80.784 70.169,83.008 J2.12@70.169,85.446
  B.Cu w0.2: v1(60.579,76.432) 67.022,76.432 v1(67.945,77.355)
pads on no net: J2.M X1.Un1 X1.Un2

## Polygon pours and split planes (outlines as drawn)
GND on F.Cu "F.Cu-GND-1" (solid, remove dead copper, pour order 1): 146.685,95.135 142.875,95.135 142.875,101.485 146.685,101.485
GND on F.Cu "F.Cu-GND" (solid, remove dead copper, pour order 0): 146.685,87.515 142.875,87.515 142.875,95.77 146.685,95.77
GND on B.Cu "B.Cu-GND" (solid, remove dead copper, pour order 2): 153.416,42.684 51.562,42.684 51.562,105.93 153.416,105.93

## Keep-outs
F.Cu:
  region: 81.178,42.735 69.139,42.735 69.139,50.355 81.178,50.355
  region: 143.637,42.684 99.06,42.684 99.06,43.446 143.637,43.446
B.Cu:
  region: 153.416,86.054 148.59,86.054 148.59,95.516 153.416,95.516
  region: 143.637,42.684 99.06,42.684 99.06,43.446 143.637,43.446
  region: 81.178,42.735 69.139,42.735 69.139,50.355 81.178,50.355
Edge.Cuts:
  lines w0: 51.562,42.684 51.562,105.93 153.416,105.93 153.416,42.684 51.562,42.684
  lines w0.254: 51.562,42.684 51.562,105.93 153.416,105.93 153.416,42.684 51.562,42.684

## Silkscreen, mask and mechanical layers (free items; w line width, h text height)
F.SilkS:
  lines w0.254: 97.282,47.51 97.79,48.272 98.298,47.51 97.282,47.51
  text "© 2026 I Stocks" at 61.214,91.756 h1
  text "+5V / (Red)" at 147.747,88.981 h1 r90
  text "Acorn IDE / Podule / V5-16d" at 108.614,88.399 h1.5
  text "CH376 USB / Module" at 58.547,79.937 h1
  text "^Pin 1" at 105.487,55.912 h1.5
  text "Disable / Flash" at 63.754,48.066 h1
Dwgs.User:
  lines w0.254: 49.022,47.51 51.562,47.51 49.276,45.224 ; 49.276,37.604 51.562,37.604 51.562,35.572 ; 49.53,42.684 51.562,42.684 51.562,40.398 ; 49.784,105.93 51.562,105.93 51.562,108.978 ; 153.416,34.556 153.416,37.604 156.718,37.604 156.718,37.35 ; 153.416,39.382 153.416,42.684 155.956,42.684 ; 153.416,107.454 153.416,105.93 155.448,105.93 ; 154.94,45.986 153.416,47.51 155.956,47.51 ; 155.194,65.671 165.735,65.671

## Text inside footprints (layer, text, board x,y; h text height)
X1: Cmts.User "Board edge" at 100.024,107.861 h0.7